# Altium PCB AHPR_Power_Management_and_Controls_Board_Unrouted.PcbDoc (part 2 of 2)
Units mil, origin at the board's own origin, x right, y up, seen from the top; angles counter-clockwise.
Board outline 2559.06 x 2204.72 mil, 2 copper layers (Top Layer, Bottom Layer); 89 components, 40 nets, 283 pads, 0 vias.
Unrouted connection lines stored in the file: 127.
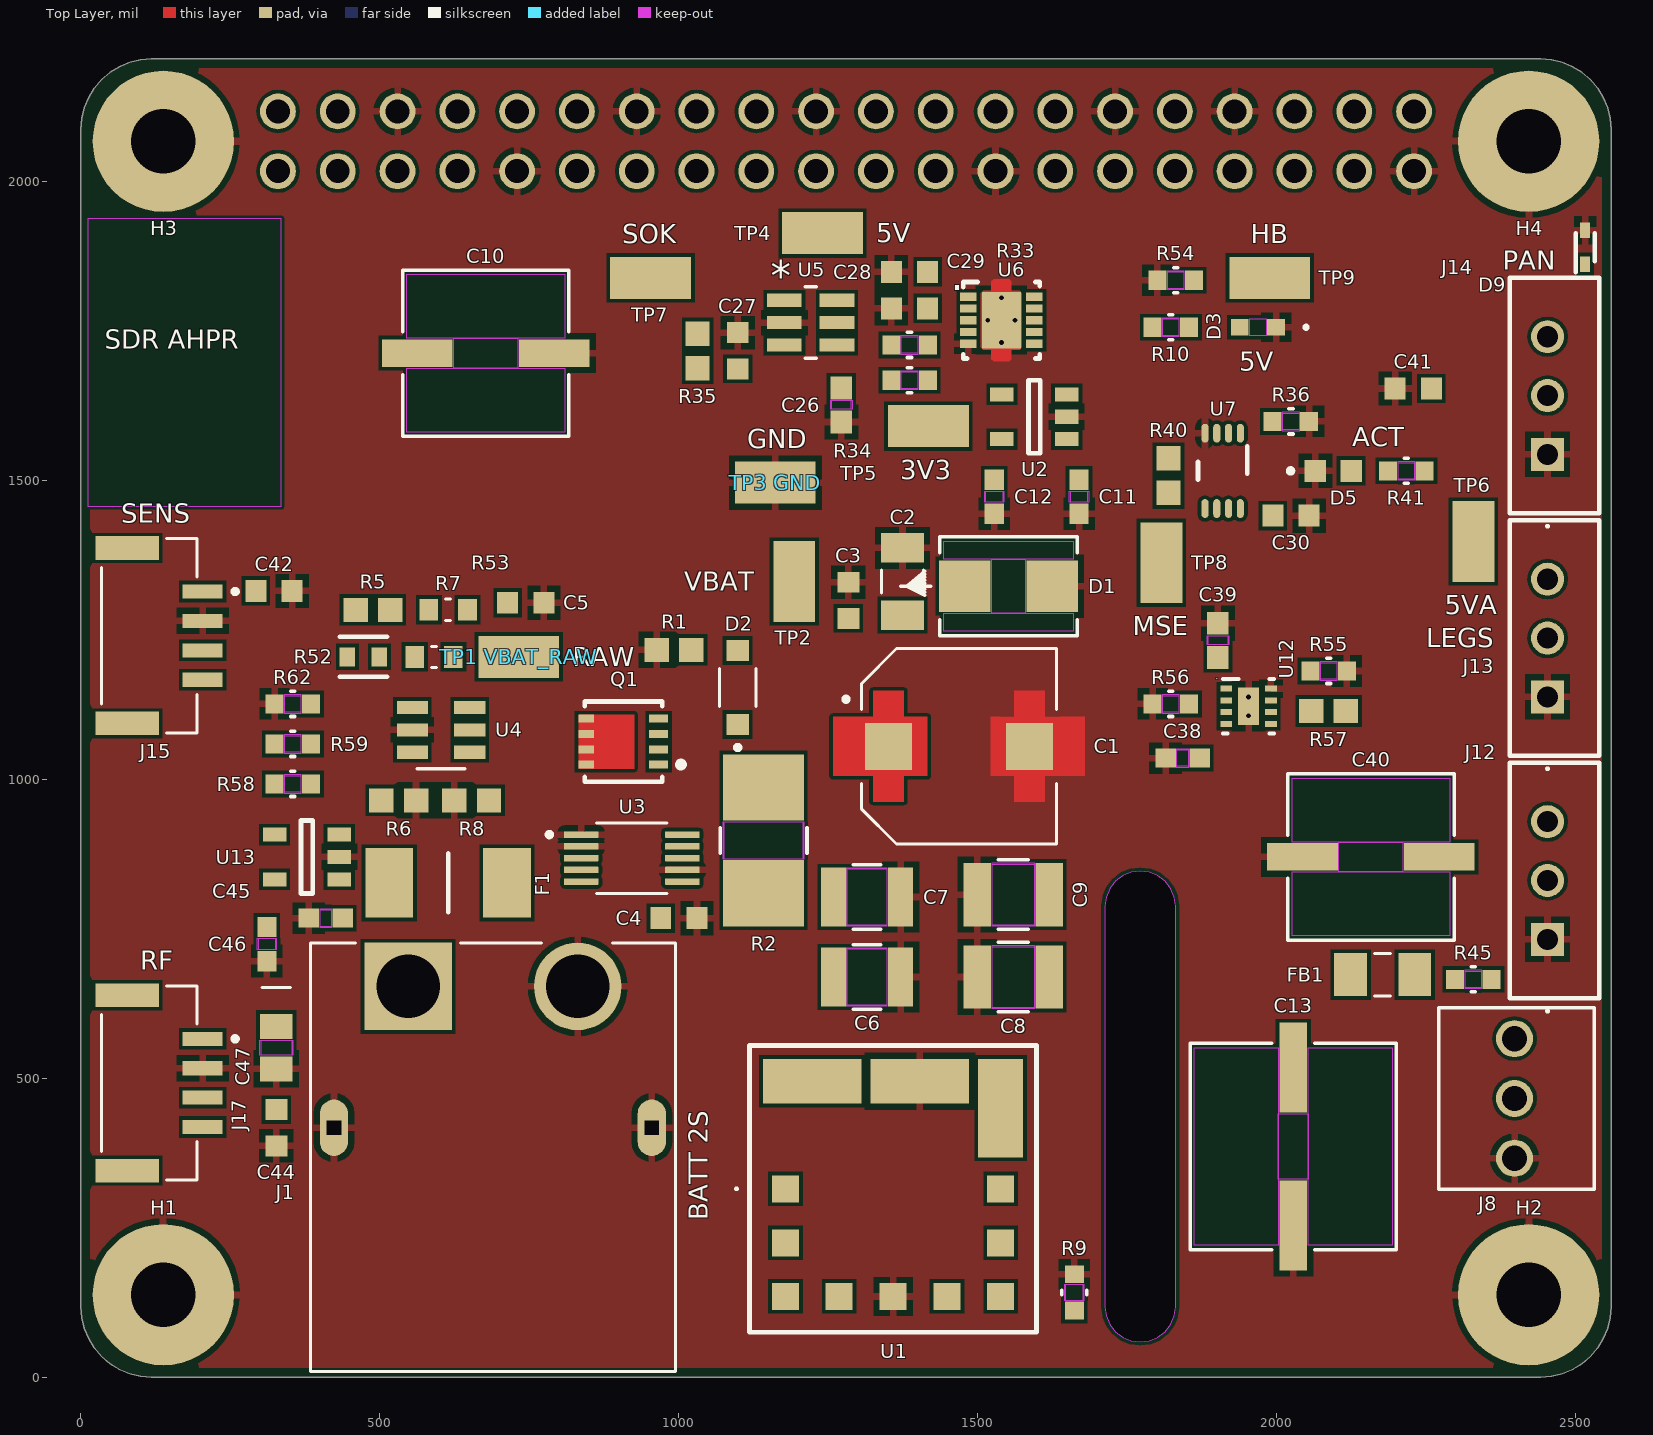
[diagram p0: Top Layer view]

## Part data (continued)
U13: library part TLV75533PDBVR, "500mA high-PSRR low-I<sub>Q</sub> low-dropout voltage regulator with enable 5-SOT-23 -40 to 125 / TI TLV75533PDBVR / 3.3 V 500 mA LDO with enable / SOT-23-5 / +3V3_RF for the rangefinder; EN = RF_POWER_EN (GPIO25) / https://www.digikey.com/en/products/detail/texas-instruments/TLV75533PDBVR/9356541", Manufacturer_Name="Texas Instruments", Copyright="Copyright (C) 2026 Ultra Librarian. All rights reserved.", Manufacturer_Part_Number=TLV75533PDBVR, RefDes=RefDes, Type=TYPE

## Nets (pads, with @x,y where several pads share a name; then routed paths per layer and width w, separated by ;. In a path a pad name is that pad's centre, name@x,y a point inside that pad or via, vN(x,y) a via of type N, cw(c..) or ccw(c..) an arc to the next point about the centre after c; other vN are vias at no path point)
+3V3_LOGIC: C4.1 C12.1 C27.2 C28.2 C30.2 R33.2 R34.2 R35.1 TP5.TP U2.5 U3.6 U5.3 U5.5 U5.6 U6.1 U6.10 U7.2 U7.7 U7.8
+3V3_PI: C42.2 J2.1 J2.17 J15.1 R57.2
+3V3_RF: C44.2 C46.2 C47.2 J17.1 U13.5
+5V: C8.2 C9.2 C10.1 C11.1 C38.2 C45.2 J2.2 J2.4 R10.2 TP4.TP U1.4 U1.5 U2.1 U2.3 U12.3 U12.4 U13.1
+5V_ACT: C40.1 C41.2 FB1.1 J13.2 J14.2 R41.1 TP6.TP U12.5
+5V_SERVO: C13.1 FB1.2 J8.2
ACT_FAULT_n: J2.13 R57.1 U12.6
BUCK_EN: R52.2 R53.1 U1.1 U4.1
DXL_DATA: D9.1 J12.3 J13.3 J14.3
GND: "TP3 GND.TP" C1.2 C2.2 C3.2 C4.2 C5.2 C6.2 C7.2 C8.1 C9.1 C10.2 C11.2 C12.2 C13.2 C26.1 C27.1 C28.1 C29.1 C30.1 C38.1 C39.2 C40.2 C41.1 C42.1 C44.1 C45.1 C46.1 C47.1 D1.2 D3.1 D5.C D9.2 H1.1 H2.1 H3.1 H4.1 J1.2 J1.SH1 J1.SH2 J2.6 J2.9 J2.14 J2.20 J2.25 J2.30 J2.34 J2.39 J8.1 J12.1 J13.1 J14.1 J15.2 J17.2 R1.1 R6.2 R8.1 R9.2 R36.2 R54.1 R55.2 R56.1 R62.1 U1.3 U1.7 U2.2 U3.1 U3.2 U3.7 U4.2 U5.2 U6.5 U6.11 U7.4 U12.8 U12.9 U13.2
HEARTBEAT: J2.40 R54.2 TP9.TP U6.7
I2C_SCL: J2.5 J15.4 U3.5
I2C_SDA: J2.3 J15.3 U3.4
LED_ACT: D5.A R41.2
MOTOR_ARM: J2.38 R36.1 U7.1
MOTOR_SAFE_EN: R40.1 R56.2 TP8.TP U7.5 U12.2
MOTOR_SAFE_EN_STAT: J2.37 R40.2
NetC26_2: C26.2 U5.4
NetC29_2: C29.2 U6.2
NetC39_1: C39.1 U12.1
NetD3_2: D3.2 R10.1
NetR9_1: R9.1 U1.6
NetR33_1: R33.1 U6.3
NetR34_1: R34.1 U6.6
NetR55_1: R55.1 U12.7
OV_SENSE: R7.1 R8.2 U4.4
PI_RXD: J2.10 R59.1
PI_TXD: J2.8 R58.1
Q1_GATE: D2.2 Q1.4 R1.2
RF_POWER_EN: J2.22 R62.2 U13.3
RF_RX: J17.4 R58.2
RF_TX: J17.3 R59.2
SAFE_OK: R35.2 TP7.TP U1.10 U3.3 U4.6 U5.1 U6.8 U7.6
SERVO_PWM: J2.12 R45.2
SERVO_PWM_J: J8.3 R45.1
UV_SENSE: R5.2 R6.1 R53.2 U4.3
VBAT_IN: F1.1 J1.1
VBAT_PROTECTED: C1.1 C2.1 C3.1 C5.1 C6.1 C7.1 D1.1 R2.2 R5.1 R7.2 R52.1 TP2.TP U1.2 U3.8 U3.9 U4.5
VBAT_RAW: "TP1 VBAT_RAW.TP" F1.2 Q1.5 Q1.6 Q1.7 Q1.8
VBAT_SNS: D2.1 Q1.1 Q1.2 Q1.3 R2.1 U3.10
pads on no net: J2.7 J2.11 J2.15 J2.16 J2.18 J2.19 J2.21 J2.23 J2.24 J2.26 J2.27 J2.28 J2.29 J2.31 J2.32 J2.33 J2.35 J2.36 J12.2 J15.MP1 J15.MP2 J17.MP1 J17.MP2 U1.8 U1.9 U1.11 U1.12 U2.4 U6.4 U6.9 U7.3 U13.4

## Polygon pours and split planes (outlines as drawn)
GND on Bottom Layer "GND_BOT" (solid, remove dead copper, pour order 4): 15.75,118.11 17.72,98.14 23.54,78.94 33,61.24 45.73,45.73 61.24,33 78.94,23.54 98.14,17.72 118.11,15.75 2440.94,15.75 2460.91,17.72 2480.12,23.54 2497.81,33 2513.33,45.73 2526.06,61.24 2535.52,78.94 2541.34,98.14 2543.31,118.11 2543.31,2086.61 2541.34,2106.58 2535.52,2125.79 2526.06,2143.48 2513.33,2159 2497.81,2171.72 2480.12,2181.19 2460.91,2187.01 2440.94,2188.98 118.11,2188.98 98.14,2187.01 78.94,2181.19 61.24,2171.72 45.73,2159 33,2143.48 23.54,2125.79 17.72,2106.58 15.75,2086.61
GND on Top Layer "GND_TOP" (solid, remove dead copper, pour order 5): 15.75,118.11 17.72,98.14 23.54,78.94 33,61.24 45.73,45.73 61.24,33 78.94,23.54 98.14,17.72 118.11,15.75 2440.94,15.75 2460.91,17.72 2480.12,23.54 2497.81,33 2513.33,45.73 2526.06,61.24 2535.52,78.94 2541.34,98.14 2543.31,118.11 2543.31,2086.61 2541.34,2106.58 2535.52,2125.79 2526.06,2143.48 2513.33,2159 2497.81,2171.72 2480.12,2181.19 2460.91,2187.01 2440.94,2188.98 118.11,2188.98 98.14,2187.01 78.94,2181.19 61.24,2171.72 45.73,2159 33,2143.48 23.54,2125.79 17.72,2106.58 15.75,2086.61

## Keep-outs
Keep-Out Layer:
  rectangle: 11.81,1456.69 334.65,1937.01

## Silkscreen, mask and mechanical layers (free items; w line width, h text height)
Top Overlay:
  text "5V" at 1330.31,1898.03 h31.5
  text "SOK" at 905.51,1896.46 h31.5
  text "HB" at 1956.69,1896.46 h31.5
  text "PAN" at 2377.95,1852.36 h31.5
  text "SDR AHPR" at 40,1720 h31.5
  text "5V" at 1937.01,1683.46 h31.5
  text "ACT" at 2125.98,1556.69 h31.5
  text "GND" at 1114.17,1553.94 h31.5
  text "3V3" at 1370.08,1501.57 h31.5
  text "SENS" at 67.72,1429.13 h31.5
  text "VBAT" at 1009.06,1314.96 h31.5
  text "5VA" at 2281.1,1275.98 h31.5
  text "MSE" at 1759.45,1240.55 h31.5
  text "LEGS" at 2250,1220.47 h31.5
  text "RAW" at 822.44,1189.37 h31.5
  text "RF" at 99.21,681.1 h31.5
  text "BATT 2S" at 1048.43,262.2 h31.5 r90

## Text inside footprints (layer, text, board x,y; h text height)
U2: Top Assembly "Designator298" at 1668.49,1509.3 h50 r180
U4: Mechanical 13 "*" at 570.36,1089.68 h50
U5: Top Overlay "*" at 1153.97,1818.18 h50; Mechanical 13 "*" at 1153.97,1818.18 h50
U7: Top Assembly "Designator9" at 1976.45,1597.75 h50 r270
U13: Top Assembly "Designator298" at 270,765 h50 r180